# Altium PCB Main_V1.PcbDoc (part 2 of 2)
Units mil, origin at the board's own origin, x right, y up, seen from the top; angles counter-clockwise.
Board outline 5895 x 2900 mil, 4 copper layers (Top Copper, GND, PWR, Bottom Copper), stack 61.811 mil thick; 126 components, 83 nets, 421 pads, 572 vias.
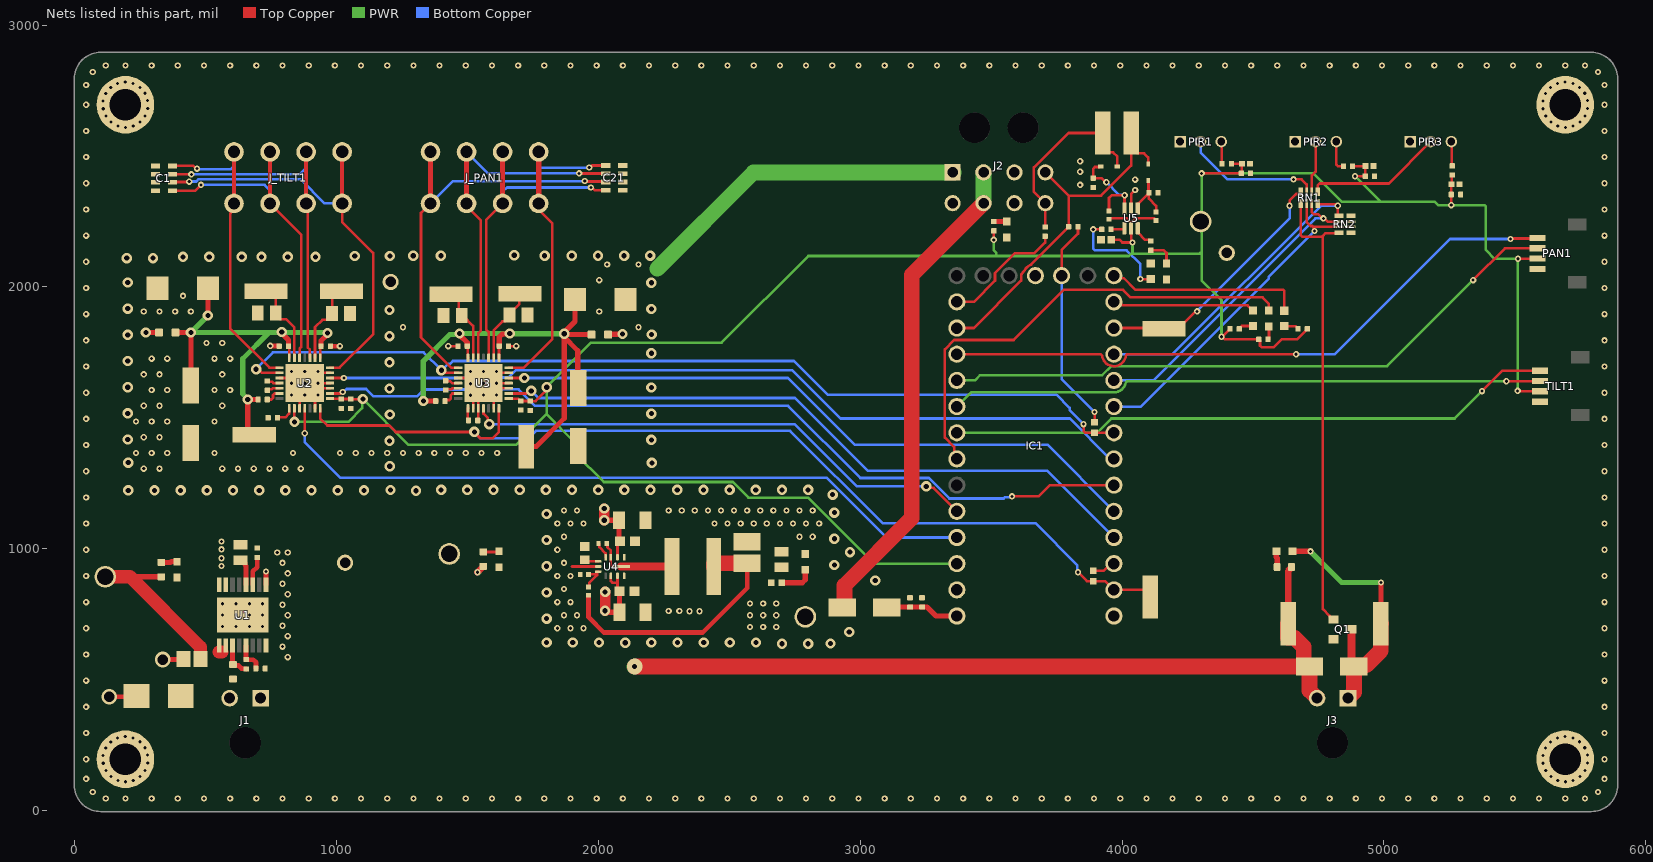
[diagram p4: the nets of this part, all layers, seen from the top]

## Via types
v1: diameter 24, hole 12, Top Copper to Bottom Copper, tented both sides, 452 vias
v2: diameter 39.37, hole 19.68, Top Copper to Bottom Copper, tented both sides, 106 vias
v3: diameter 40, hole 20, Top Copper to Bottom Copper, tented both sides, 11 vias
v4: diameter 60, hole 40, Top Copper to Bottom Copper, tented both sides, 2 vias
v5: diameter 60, hole 20, Top Copper to Bottom Copper, tented both sides, 1 vias

## Nets (pads, with @x,y where several pads share a name; then routed paths per layer and width w, separated by ;. In a path a pad name is that pad's centre, name@x,y a point inside that pad or via, vN(x,y) a via of type N, cw(c..) or ccw(c..) an arc to the next point about the centre after c; other vN are vias at no path point)
+3V3: 3V3.1 C10.2 C11.2 C17.2 C18.2 C31.1 C32.1 C33.1 C34.1 C35.1 C36.1 C37.1 IC1.31 PAN1.2 R15.2 R16.2 R17.2 R18.2 R20.2 R23.1 R25.1 R26.1 R28.1 TILT1.2 U2.9 U2.15 U3.15 U5.5 | length 10468.6
  Top Copper w10: v2(838.57,1484.57) U2.9@838.57,1536.09 ; U2.15@974.4,1573.49 974.72,1573.17 1016.54,1573.17 C10.2@1018,1571.72 1018.36,1572.07 C11.2@1053.64,1572.07 ; C11.2@1054,1571.43 1054.28,1571.72 1099.72,1571.72 v3(1100,1572) ; U3.15@1657.14,1573.49 1693.24,1573.49 1702.02,1564.72 C17.2@1703,1564.72 1703.36,1564.36 1738.64,1564.36 C18.2@1739,1564 1760,1564 1796.26,1600.26 1796.26,1611.26 v3(1802,1617) ; v1(3510,2180) R28.1@3510,2214.57 ; R20.2@3950,2258.33 3953.67,2262 4018,2262 4031.54,2248.46 4031.54,2242.83 4034.41,2242.83 4037.17,2242.83 U5.5@4037.22,2242.78 ; C37.1@3958.58,2180 3991.45,2180 4001.45,2170 v1(4040,2170) 4040,2173.79 4034.41,2179.38 U5.5@4034.41,2224.41 4034.41,2243.41 4054,2263 4121.08,2263 4129.92,2254.17 R18.2@4130,2254.17 ; v1(4304,2434) C31.1@4455.57,2434 4456.93,2435.36 4456.93,2469.64 C32.1@4457.79,2470.5 ; R23.1@4412.28,1840 4412.28,1839.02 4383.27,1810 v1(4380,1810) 4382.86,1810 4392.86,1800 R25.1@4522.28,1800 4527.13,1795.16 4527.13,1775.86 4532.98,1770 4580,1770 4610,1800 4668.7,1800 4707.72,1839.02 R26.1@4707.72,1840 ; R15.2@4417.72,2470 4418.22,2470.5 C32.1@4457.79,2470.5 ; C32.1@4458.29,2471 C32.1@4457.79,2470.5 ; R16.2@4880.72,2461 4881.22,2461.5 4929.15,2461.5 C34.1@4929.32,2461.68 ; v1(4890,2423) C33.1@4929,2423 4929.32,2423.32 C34.1@4929.32,2461.68 ; C34.1@4929.65,2462 C34.1@4929.32,2461.68 ; C35.1@5257,2349 5257,2392 C36.1@5257,2395 ; v1(5257.57,2312.57) C35.1@5257.57,2353 ; C36.1@5258.29,2392 5259.15,2392.85 5259.15,2428.43 R17.2@5260,2429.28 ; v1(5511,1603) 5512.69,1601.32 TILT1.2@5597.26,1601.32 ; v1(5512.5,2107.5) 5512.91,2107.91 5585.86,2107.91 PAN1.2@5586.26,2108.31
  PWR w10: v2(838.57,1484.57) 1044.57,1484.57 1097,1537 1097,1569 v3(1100,1572) 1275,1397 1685,1397 1802,1514 ; IC1.31@3369,943 3052.11,943 2799.8,1195.31 2572.67,1195.31 2513.3,1254.69 2020.31,1254.69 1911.16,1363.84 1911.16,1404.84 1802,1514 ; v1(3510,2180) 3510,2140 3520,2130 3520,2118 ; v1(4040,2170) 4040,2132.77 4033.72,2126.49 ; 4299.63,2130 4304,2134.37 ; 4299.82,2129.82 4296.49,2126.49 4033.72,2126.49 ; v1(4380,1810) 4380,1949.18 4304,2025.18 4304,2134.37 ; v1(4890,2423) 4987,2326 ; v1@5257.57,2311.57 5208.43,2311.57 5194,2326 4987,2326 ; v1(5257.57,2312.57) 5383.71,2312.57 5389.57,2306.71 5389.57,2141.43 5423.5,2107.5 v1(5512.5,2107.5) 5511.75,2106.75 5511.75,1603.75 v1(5511,1603) ; 1802,1514 v3(1802,1617) 1972.31,1787.31 2470.82,1787.31 2801.5,2118 3520,2118 ; 3520,2118 4025.23,2118 4033.72,2126.49 ; 4304,2134.37 v1(4304,2434) 4731.11,2434 4839.11,2326 4987,2326
+3V3_R: IC1.16 R12.2 R14.2 | length 825.5
  Top Copper w10: IC1.16@3769,2043 3769,2141 3831.72,2203.72 R12.2@3831.72,2230 ; R14.2@3895,1482.69 v1(3895,1522)
  Bottom Copper w10: IC1.16@3769,2043 3769,1648 v1(3895,1522)
+5: +5.1 C27.1 C28.1 D4.1 J2.2 J2.6 L1.2 R10.2 R27.1 | length 2908.5
  Top Copper w18: R10.2@1962,822.33 1962,738 2020,680 2398,680 2568,850 C27.1@2568,944.64
  Top Copper w60: L1.2@2440.06,932 2440.06,942.79 2441.91,944.64 C27.1@2568,944.64 ; D4.1@2928.35,777 2935.18,777 2939.62,781.45 2939.62,859.62 3197,1117 3197,2045.99 J2.6@3470.82,2319.81
  PWR w60: J2.6@3470.82,2319.81 J2.2@3470.82,2437.92
  other v1: 2579,701 2629,701 2679,701 2579,746 2629,746 2679,746 2579,791 2629,791 2679,791
+5OUT_Pan: C15.2 U3.8 | length 47.3
  Top Copper w10: C15.2@1498.72,1486 C15.2@1499.03,1486.31 ; C15.2@1501.31,1489.31 1501.31,1535.77 U3.8@1501.63,1536.09
+5OUT_Tilt: C7.2 U2.8 | length 74.5
  Top Copper w10: C7.2@769.72,1502 804,1502 818.57,1516.57 818.57,1535.77 U2.8@818.89,1536.09
+24: +24.1 C3.2 D1.1 J1.2 R1.2 R22.1 U1.1 U1.2 | length 649.8
  Top Copper w20: 211,893 329.44,893 R22.1@330,892.44
  Top Copper w50: +24.1@116,893 211,893 479.52,624.48 C3.2@479.52,578.69 ; U1.1@551,605.41 561,605.41
DIAG_Pan: IC1.29 U3.11 | length 1993.3
  Top Copper w10: U3.11@1560.68,1536.09 1561,1535.77 1561,1515.97 1577.26,1499.71 1577.26,1481.74 v3(1583,1476) ; v3(3252,1238) 3257.74,1232.26 3279.74,1232.26 IC1.29@3369,1143
  Bottom Copper w10: v3(1583,1476) 2749,1476 2987,1238 v3(3252,1238)
DIAG_Tilt: IC1.30 U2.11 | length 2770.9
  Top Copper w10: v1(877.94,1440.94) U2.11@877.94,1536.09
  Bottom Copper w10: v1(877.94,1440.94) 877.94,1407.07 1014.02,1271 2872,1271 3100,1043 IC1.30@3369,1043
DIR_Pan: IC1.5 U3.19 | length 2522.8
  Top Copper w10: U3.19@1657.14,1652.23 v3(1717.23,1652.23)
  Bottom Copper w10: v3(1717.23,1652.23) 2723.77,1652.23 2978.65,1397.35 3714.65,1397.35 IC1.5@3969,1143
DIR_Tilt: IC1.7 U2.19 | length 3147.5
  Top Copper w10: U2.19@974.4,1652.23 v1(1027.23,1652.23)
  Bottom Copper w10: v1(1027.23,1652.23) 1538.23,1652.23 1540,1654 1656,1654 1684.23,1682.23 2739.77,1682.23 2924.65,1497.35 3800.54,1497.35 3954.89,1343 IC1.7@3969,1343
EN: IC1.8 R14.1 U2.2 U3.2 | length 3644.9
  Top Copper w10: v3(692,1686) 700.12,1686 714.2,1671.91 U2.2@781.49,1671.91 ; v3(1400,1682.23) 1408.12,1682.23 1418.43,1671.91 U3.2@1464.23,1671.91 ; v1(3853,1476) 3853,1449.02 3858.86,1443.16 3968.84,1443.16 IC1.8@3969,1443
  Bottom Copper w10: v3(692,1686) 756,1750 1332.23,1750 v3(1400,1682.23) ; v3@1400.54,1680.61 1425.83,1705.9 1432.9,1705.9 1444,1717 2747,1717 2875.35,1588.65 3749.67,1588.65 3799.99,1538.32 3799.99,1529.01 v1(3853,1476) ; IC1.8@3968.84,1443.16 IC1.8@3969,1443
Fault: Fault.1 IC1.27 | length 1816
  Top Copper w10: IC1.27@3369,1343 3358.37,1353.63 3358.37,1389.07 3323.35,1424.09 3323.35,1761.91 3358.79,1797.35 3585.88,1797.35 3777.18,1988.65 4004.26,1988.65 4032.91,1960 4536.5,1960 4560,1936.5 Fault.1@4560,1910.5
GND: +3V3.1 C1.5 C1.6 C1.7 C1.8 C2.2 C3.1 C7.1 C8.2 C9.2 C10.1 C11.1 C14.2 C15.1 C16.2 C17.1 C18.1 C19.2 C20.2 C21.5 C21.6 C21.7 C21.8 C23.2 C24.2 C25.2 C26.2 C27.2 C28.2 C29.2 C30.2 C31.2 C32.2 C33.2 C34.2 C35.2 C36.2 C37.2 C38.1 C39.1 D1.2 D2.2 D3.2 GND1.1 GND3.1 GND.1 IC1.1 IC1.17 IC1.32 J1.1 J2.3 J2.5 J2.7 LED2.1 LED3.1 LED5.1 pad.20 PAN1.1 PIR1.1 PIR2.1 PIR3.1 Q1.2 R3.2 R6.2 R7.1 R8.2 R9.1 RN2.5 RN2.6 RN2.7 RN2.8 RX.1 TILT1.1 TX.C U1.9 U2.3 U2.10 U2.13 U2.17 U2.18 U2.20 U2.29 U3.3 U3.9 U3.10 U3.13 U3.17 U3.18 U3.20 U3.29 U4.1 U4.6 U4.11 U5.2 | length 1722.6
  Top Copper w10: U2.3@781.49,1652.23 858.26,1652.23 U2.29@877.94,1632.54 ; U2.10@858.26,1536.09 858.26,1612.86 U2.29@877.94,1632.54 ; U2.13@917.32,1536.09 917.32,1593.17 897.63,1612.86 U2.17@974.4,1612.86 ; U2.29@928,1632.54 U2.18@974.4,1632.54 ; U2.20@974.4,1671.91 917.32,1671.91 U2.29@877.94,1632.54 ; v1(1426,1774) C14.2@1463.28,1774 ; U3.3@1464.23,1652.23 1541,1652.23 U3.29@1560.68,1632.54 U3.29@1580.37,1612.86 ; U3.9@1521.31,1536.09 1521.31,1593.17 1541,1612.86 U3.10@1541,1536.09 1541,1489.28 C15.1@1536.72,1485 ; U3.13@1600.06,1536.09 1600.06,1593.17 U3.29@1580.37,1612.86 ; U3.29@1610.74,1632.54 U3.18@1657.14,1632.54 ; U3.29@1610.74,1671.91 U3.20@1657.14,1671.91 ; C16.2@1656.43,1774 v1(1686,1774) ; U3.17@1657.14,1612.86 U3.29@1580.37,1612.86 ; 1899,932 U4.6@1998.88,932 ; U5.2@4034.41,2300 4034.41,2354.41 v1(4050,2370)
  Top Copper w15: v1(192.4,282.25) 218.99,282.25 pad.20@227.43,290.7
  Top Copper w18: v4(131,434.69) 232.35,434.69 D1.2@235.35,437.69 ; v4(336,576.69) 412.48,576.69 C3.1@414.48,578.69 ; R3.2@697.55,1899 R3.2@698.55,1900 ; v1@730,912.69 v1(730.08,912.61) 730.16,912.54 U1.9@730.16,862.14 ; v1(746,1775) 746.5,1774.5 779.78,1774.5 C8.2@780.28,1774 ; C9.2@975.72,1774 v1(1012,1774) ; R6.2@1051.45,1898 R6.2@1052.45,1899
  other v1: 118,46 193,46 293,46 393,46 493,46 593,46 693,46 793,46 893,46 993,46 1093,46 1193,46 1293,46 1393,46 1493,46 1593,46 1693,46 1793,46 1893,46 1993,46 2093,46 2193,46 2293,46 2393,46 2493,46 2593,46 2693,46 2793,46 2893,46 2993,46 3093,46 3193,46 3293,46 3393,46 3493,46 3593,46 3693,46 3793,46 3893,46 3993,46 4093,46 4193,46 4293,46 4393,46 4493,46 4593,46 4693,46 4793,46 4893,46 4993,46 5093,46 5193,46 5293,46 5393,46 5493,46 5593,46 5693,46 5768,46 68,71 5818,71 193.6,109.75 5693.6,109.75 164.06,114.74 223.06,115.15 5664.06,114.74 5723.06,115.15 43,121 5843,121 138.02,129.54 248.9,130.31 5638.02,129.54 5748.9,130.31 118.6,152.35 5618.6,152.35 268,153.39 5768,153.39 108.16,180.43 5608.16,180.43 278.05,181.61 5778.05,181.61 43,196 5843,196 107.95,210.39 5607.95,210.39 277.84,211.57 5777.84,211.57 118,238.61 5618,238.61 267.4,239.65 5767.4,239.65 137.1,261.69 247.98,262.46 5637.1,261.69 5747.98,262.46 162.93,276.85 162.93,276.85 221.94,277.26 5662.93,276.85 5662.93,276.85 5721.94,277.26 192.4,282.25 5692.4,282.25 5692.4,282.25 43,296 5843,296 43,396 5843,396 43,496 5843,496 43,596 5843,596 43,696 1843,696 1893,696 1943,696 5843,696 1868,746 1918,746 2348,761 2386,761 2268,762 2309,762 43,796 1843,796 1893,796 5843,796 1868,846 43,896 1843,896 1893,896 5843,896 1868,946 43,996 1843,996 5843,996 1868,1046 2768,1046 2818,1046 43,1096 1843,1096 1893,1096 1943,1096 2443,1096 2493,1096 2543,1096 2593,1096 2643,1096 2693,1096 2743,1096 2793,1096 2843,1096 5843,1096 1868,1146 1918,1146 2268,1146 2318,1146 2368,1146 2418,1146 2468,1146 2518,1146 2568,1146 2618,1146 2668,1146 2718,1146 2768,1146 2818,1146 43,1196 5843,1196 43,1296 5843,1296 263,1306 323,1306 563,1306 623,1306 683,1306 743,1306 803,1306 863,1306 233,1366 293,1366 353,1366 533,1366 833,1366 1013,1366 1073,1366 1133,1366 1193,1366 1253,1366 1313,1366 1373,1366 1433,1366 1493,1366 1553,1366 1613,1366 43,1396 5843,1396 263,1426 323,1426 233,1486 293,1486 353,1486 533,1486 43,1496 5843,1496 263,1546 323,1546 563,1546 1510.74,1586.23 828,1587 878,1587 928,1587 1560.74,1587 1610.74,1587 43,1596 5843,1596 293,1606 353,1606 533,1606 593,1606 1510.74,1630.23 828,1632 878,1632 928,1632 1560.74,1632 1610.74,1632 263,1666 323,1666 563,1666 828,1677 878,1677 928,1677 1510.74,1677 1560.74,1677 1610.74,1677 43,1696 5843,1696 293,1726 353,1726 533,1726 593,1726 503,1786 563,1786 43,1796 5843,1796 1253,1846 2153,1846 43,1896 5843,1896 263,1906 323,1906 383,1906 443,1906 2003,1906 413,1966 43,1996 5843,1996 2003,2026 2033,2086 2153,2086 43,2096 5843,2096 43,2196 5843,2196 43,2296 5843,2296 3840,2390 43,2396 5843,2396 4050,2410 3840,2440 3840,2480 43,2496 5843,2496 43,2596 5843,2596 193.6,2609.75 5693.6,2609.75 164.06,2614.74 223.06,2615.15 5664.06,2614.74 5723.06,2615.15 138.02,2629.54 248.9,2630.31 5638.02,2629.54 5748.9,2630.31 118.6,2652.35 5618.6,2652.35 268,2653.39 5768,2653.39 108.16,2680.43 5608.16,2680.43 278.05,2681.61 5778.05,2681.61 43,2696 5843,2696 107.95,2710.39 5607.95,2710.39 277.84,2711.57 5777.84,2711.57 118,2738.61 5618,2738.61 267.4,2739.65 5767.4,2739.65 137.1,2761.69 247.98,2762.46 5637.1,2761.69 5747.98,2762.46 43,2771 5843,2771 162.93,2776.85 162.93,2776.85 221.94,2777.26 5662.93,2776.85 5662.93,2776.85 5721.94,2777.26 192.4,2782.25 192.4,2782.25 5692.4,2782.25 5692.4,2782.25 68,2821 5818,2821 118,2846 193,2846 293,2846 393,2846 493,2846 593,2846 693,2846 793,2846 893,2846 993,2846 1093,2846 1193,2846 1293,2846 1393,2846 1493,2846 1593,2846 1693,2846 1793,2846 1893,2846 1993,2846 2093,2846 2193,2846 2293,2846 2393,2846 2493,2846 2593,2846 2693,2846 2793,2846 2893,2846 2993,2846 3093,2846 3193,2846 3293,2846 3393,2846 3493,2846 3593,2846 3693,2846 3793,2846 3893,2846 3993,2846 4093,2846 4193,2846 4293,2846 4393,2846 4493,2846 4593,2846 4693,2846 4793,2846 4893,2846 4993,2846 5093,2846 5193,2846 5293,2846 5393,2846 5493,2846 5593,2846 5693,2846 5768,2846
  other v2: 2701,637 2801,637 2886,638 2102,641.13 1802,642 1902,642 2002,642 2202,642 2302,642 2402,642 2502,642 2602,642 2958,682 1802,733 1802,833 3057,879 1802,933 2901,938 2961,987 1802,1033 2901,1038 1802,1133 2901,1138 2894.35,1206.67 1302.69,1221.7 204,1223 304,1223 404,1223 504,1223 604,1223 704,1223 804,1223 904,1223 1004,1223 1104,1223 1205.69,1224 1399,1225 1499,1225 1599,1225 1699,1225 1799,1225 1899,1225 1999,1225 2099,1225 2199,1225 2301,1225 2401,1225 2501,1225 2601,1225 2701,1225 2801,1225 1202.53,1315.2 2204,1328 204,1329 1202,1412 2202,1416 202,1417 1202.99,1512.99 2202,1516 202,1517 1202,1612 2202,1616 202,1617 1202,1712 202,1717 2202,1746.69 1202,1812 202,1817 2203,1818 1202,1912 2202,1916 202,1917 2202,2016 202,2017 198,2110 298,2110 413,2115 513,2115 637.3,2115 713,2115 813,2115 918.69,2115 1069,2118 1203,2118 1292.31,2119 1398,2119 1794.31,2119 1898,2119 1998,2119 2098,2119 2197.33,2119.67 1678,2121
MotorReady: IC1.14 MotorReady.C | length 750
  Top Copper w10: IC1.14@3969,2043 3978.78,2033.22 4006.78,2033.22 4050,1990 4614.14,1990 4620,1984.14 MotorReady.C@4620,1909.53
NetC2_1: C2.1 C5.1 C8.1 C9.1 D2.1 F1.1 U2.22 U2.28 VM_M1.1 | length 1693.1
  Top Copper w10: C8.1@813.06,1774 818.89,1768.17 U2.28@818.89,1729 ; U2.22@937,1729 937,1770.72 C9.1@940.28,1774
  Top Copper w20: F1.1@383.99,1826 v2(443,1826) C2.1@443,1624.24 ; v2(508,1891) D2.1@508,1995 ; VM_M1.1@685,1435 679.53,1435 660,1454.53 v2(660,1570) C5.1@699.57,1570 ; v2(790,1828) 790,1822.76 816,1796.76 C8.1@816,1774.28 ; C9.1@940.28,1774 940.44,1774.16 940.44,1794.2 965,1818.76 v2(965,1824)
  PWR w20: v2(508,1891) v2(443,1826) 741,1826 ; v2(660,1570) 660,1572.4 641,1591.4 641,1726 741,1826 ; v2(965,1824) 963,1826 792,1826 v2(790,1828) 788,1826 741,1826
NetC4_1: C4.1 U1.12 | length 107.5
  Top Copper w18: C4.1@632,956.17 639.87,956.17 649.57,946.46 649.57,938.59 653.39,934.78 U1.12@653.39,862.14
NetC5_2: C5.2 U2.6 | length 62.8
  Top Copper w10: C5.2@735,1570 751,1570 756.86,1575.86 756.86,1587.32 762.4,1592.86 781.17,1592.86 U2.6@781.49,1593.17
NetC6_1: C6.1 U2.4 | length 48.9
  Top Copper w10: C6.1@735.98,1640.72 738.56,1638.14 752.86,1638.14 758.46,1632.54 U2.4@781.49,1632.54
NetC6_2: C6.2 U2.5 | length 48.6
  Top Copper w10: C6.2@735.98,1605.28 739.68,1608.98 751.75,1608.98 755.63,1612.86 U2.5@781.49,1612.86
NetC12_1: C12.1 C14.1 C16.1 C19.1 D3.1 F2.1 U3.22 U3.28 VM_M2.1 | length 2036
  Top Copper w10: C14.1@1498.72,1774 1501.31,1771.4 1501.31,1729.32 U3.28@1501.63,1729 ; U3.22@1619.74,1729 1620.06,1729.32 C16.1@1620.06,1773.06
  Top Copper w20: v2(1331,1564) C12.1@1378.28,1564 ; v2(1469,1822) 1469,1816.76 1498.56,1787.2 1498.56,1774.16 C14.1@1498.72,1774 ; C16.1@1621,1774 1621,1808.76 1632.72,1820.47 1659.47,1820.47 v2(1661,1822) ; VM_M2.1@1729.9,1387.1 1733.8,1391 1762,1391 1869.23,1498.23 v2@1869.23,1808.19 ; v2@1866,1824 1910.54,1868.54 D3.1@1910.54,1952 ; v2(1869,1821) 1869.23,1820.77 v2@1869.23,1808.19 ; v2@1872,1818 F2.1@1973.5,1818 ; C19.1@1921,1556.74 1921,1756.41 v2@1869.23,1808.19
  PWR w20: v2(1331,1564) 1331,1717.18 1432.11,1818.29 1465.29,1818.29 v2(1469,1822) v2(1661,1822) 1661.5,1821.5 1860.05,1821.5 1861,1820.55 v2@1861,1819
NetC12_2: C12.2 U3.6 | length 69.8
  Top Copper w10: C12.2@1413.72,1564 1417.73,1568.02 1430.14,1568.02 1436,1573.87 1436,1587 1441.86,1592.86 U3.6@1463.91,1592.86
NetC13_1: C13.1 U3.4 | length 52
  Top Copper w10: C13.1@1416,1641.72 1418.19,1639.52 1434.25,1639.52 1441.23,1632.54 U3.4@1464.23,1632.54
NetC13_2: C13.2 U3.5 | length 51
  Top Copper w10: C13.2@1416,1606.28 1419.08,1609.36 1438.64,1609.36 1442.14,1612.86 U3.5@1464.23,1612.86
NetC20_1: C20.1 U4.5 | length 53.4
  Top Copper w10: C20.1@1948,957.82 1954.13,951.68 U4.5@1998.88,951.68
NetC22_1: C22.1 U4.4 | length 63.8
  Top Copper w10: C22.1@2000.25,1020 2003.13,1017.13 2003.13,1005.87 2027.43,981.57 U4.4@2027.43,967.43
NetC29_1: C29.1 C30.1 D4.2 IC1.33 | length 285.9
  Top Copper w20: D4.2@3097.65,777 3097.93,777.28 C29.1@3190,777.28 3190.14,777.43 3235.86,777.43 C30.1@3236,777.57 3254.43,777.57 3289,743 IC1.33@3369,743
NetC38_2: C38.2 R18.1 U5.1 U6.2 | length 211.1
  Top Copper w10: U5.1@4060,2300 4062.87,2302.87 4062.87,2319.61 4102.28,2359.02 C38.2@4102.28,2360 ; U6.2@4100,2407 4101.14,2405.86 4101.14,2361.14 C38.2@4102.28,2360 ; R18.1@4130,2285.83 4130,2310 4102.28,2337.72 C38.2@4102.28,2360
NetC39_2: C39.2 R20.1 U5.3 U7.2 | length 386.8
  Top Copper w10: C39.2@3890,2415.43 3920.78,2415.43 3936.21,2400 v1(3940,2400) ; C39.2@3890,2416.69 3890,2452.14 3895.86,2458 3913.5,2458 3915.5,2460 U7.2@3918.5,2460 ; R20.1@3950,2292.18 3950,2340 3960,2350 v1(4010,2350) 4009.41,2349.41 4009.41,2290.59 U5.3@4010,2290
  Bottom Copper w10: v1(3940,2400) 3987.32,2352.68 4007.32,2352.68 v1(4010,2350)
NetD6_A: R21.2 TX.A | length 408.1
  Top Copper w10: v1(3890,2220) R21.2@3922.28,2220 ; v1(4070,2030) 4109.53,2030 TX.A@4110,2030.47
  Bottom Copper w10: v1(3890,2220) 3890,2145.86 3895.86,2140 4017.14,2140 4070,2087.14 v1(4070,2030)
NetD7_A: R23.2 Status.A | length 57.4
  Top Copper w10: R23.2@4447.72,1840 4447.72,1840.98 4457.68,1850.94 Status.A@4500,1850.94
NetD8_A: MotorReady.A R26.2 | length 57.2
  Top Copper w10: MotorReady.A@4620,1850.47 4662.8,1850.47 4672.28,1840.98 R26.2@4672.28,1840
NetIC1_3: IC1.3 R13.2 | length 90.3
  Top Copper w10: R13.2@3890,915.69 3928.75,915.69 3956.07,943 IC1.3@3969,943
NetIC1_21: IC1.21 R11.1 | length 471.6
  Top Copper w10: IC1.21@3369,1943 3433.56,1943 3514.65,2024.09 3514.65,2053.21 3589.44,2128 3664,2128 3706,2170 R11.1@3706,2193.57
NetLED1_2: R19.2 RX.2 | length 104.1
  Top Copper w10: R19.2@4110,2140 4160,2140 4170,2130 RX.2@4170,2090
NetLED2_2: LED2.2 R22.2 | length 61.6
  Top Copper w20: R22.2@330,947.56 364.78,947.56 368.6,951.37 LED2.2@390,951.37
NetLED3_2: LED3.2 R24.2 | length 61.2
  Top Copper w10: R24.2@1560,987.56 1617.06,987.56 LED3.2@1620,990.5
NetLED4_2: Fault.2 R25.2 | length 50.4
  Top Copper w10: Fault.2@4560,1849.5 4561.14,1848.36 4561.14,1801.14 R25.2@4562.28,1800
NetLED5_2: LED5.2 R27.2 | length 132
  Top Copper w20: R27.2@2699.69,870 2778.28,870 2790,881.72 LED5.2@2790,918.5
NetLED6_2: +3V3.2 R28.2 | length 50.1
  Top Copper w20: R28.2@3510,2250 3510.16,2250.16 +3V3.2@3560,2250.16
NetLED7_2: LED7.2 R29.2 | length 49.1
  Top Copper w20: LED7.2@4588.63,977.56 4588.63,968.6 4592.44,964.78 R29.2@4592.44,930
NetPIR1_3: PIR1.3 R15.1 | length 86.4
  Top Copper w10: PIR1.3@4379,2555 4380.64,2553.36 4380.64,2471.64 R15.1@4382.28,2470
NetPIR2_3: PIR2.3 R16.1 | length 117.5
  Top Copper w10: PIR2.3@4818.37,2555 4818.37,2466.86 4824.23,2461 R16.1@4845.28,2461
NetPIR3_3: PIR3.3 R17.1 | length 93.6
  Top Copper w10: PIR3.3@5257.74,2555 5259.37,2553.37 5259.37,2464.35 R17.1@5261,2462.72
NetR1_1: R1.1 R2.1 U1.3 | length 129.8
  Top Copper w18: U1.3@602.2,629.86 602.2,559.49 608,553.69 625,553.69 636,542.69 639,542.69 639.87,541.82 653.16,541.82 R2.1@654,540.98
NetR2_2: R2.2 R4.2 U1.5 | length 117.5
  Top Copper w18: U1.5@653.39,629.86 653.53,629.72 653.53,576.88 R2.2@654,576.41 ; R2.2@654.98,576.41 681.25,576.41 691.8,565.87 R4.2@691.8,543.21
NetR5_2: R5.2 U1.11 | length 111.9
  Top Copper w18: U1.11@678.98,862.14 679.12,862.28 679.12,913.25 696,930.13 R5.2@696,966.98
NetR9_2: R9.2 R10.1 U4.7 | length 109.6
  Top Copper w10: R10.1@1962,854 1965.37,857.36 1965.37,870.36 1994.65,899.65 ; R9.2@1962,902 1992.29,902 1994.65,899.65 ; U4.7@1998.88,912.32 1994.73,912.32 1994.65,912.24 1994.65,899.65
NetR19_1: R19.1 U5.6 | length 80.4
  Top Copper w10: U5.6@4060,2224.41 4060,2208.86 4088.58,2180.28 4105.16,2180.28 R19.1@4110,2175.43 R19.1@4110.98,2175.43
NetR21_1: R21.1 U5.4 | length 53.8
  Top Copper w10: R21.1@3957.72,2220 4005.94,2220 4008.82,2222.87 U5.4@4008.82,2224.41
Pan_OA1: C21.4 J_PAN1.3 J_PAN1.4 U3.24 | length 1277.4
  Top Copper w10: U3.24@1580.37,1729 1580.37,1827.75 1571,1837.12 1571,2256.2 J_PAN1.3@1633.8,2319 ; v1(1971,2380) 1974.79,2380 1985.28,2369.5 C21.4@2028,2369.5
  Top Copper w20: J_PAN1.3@1633.8,2319 J_PAN1.4@1633.8,2515.85 J_PAN1.4@1641.57,2523.63
  Bottom Copper w10: J_PAN1.3@1633.8,2319 1636.18,2321.39 1636.18,2365.54 1650.64,2380 v1(1971,2380)
Pan_OA2: C21.1 J_PAN1.1 J_PAN1.2 U3.21 | length 1264.9
  Top Copper w10: U3.21@1657.14,1691.6 1714.6,1691.6 1824,1801 1824,2242.74 1783.99,2282.75 1783.99,2306.6 J_PAN1.1@1771.59,2319 ; v1(1965,2456) 1968.79,2456 1976.78,2463.99 C21.1@2028,2463.99
  Top Copper w20: J_PAN1.1@1771.59,2319 J_PAN1.2@1771.59,2515.85
  Bottom Copper w10: J_PAN1.2@1771.59,2515.85 1771.59,2461.86 1777.45,2456 v1(1965,2456)
Pan_OB1: C21.2 J_PAN1.5 J_PAN1.6 U3.26 | length 1405.4
  Top Copper w10: J_PAN1.5@1496,2329 1486,2319 J_PAN1.5@1496,2319 1496,2309 1551,2254 1551,1834 1541,1824 U3.26@1541,1729 ; v1(1926,2434) 1926.75,2433.25 2027.25,2433.25 C21.2@2028,2432.5
  Top Copper w20: J_PAN1.5@1496,2329 J_PAN1.6@1496,2515.85 J_PAN1.6@1503.78,2523.63
  Bottom Copper w10: J_PAN1.6@1496,2515.85 1577.85,2434 v1(1926,2434)
Pan_OB2: C21.3 J_PAN1.7 J_PAN1.8 U3.1 | length 1620.4
  Top Copper w10: J_PAN1.7@1358.2,2319 1322,2282.8 1322,1807 1437.4,1691.6 U3.1@1464.23,1691.6 ; v1(1947.42,2404.37) 1949.11,2402.69 2026.31,2402.69 C21.3@2028,2401
  Top Copper w20: J_PAN1.7@1358.2,2319 J_PAN1.8@1358.2,2515.85
  Bottom Copper w10: J_PAN1.7@1358.2,2319 1443.58,2404.37 v1(1947.42,2404.37)
Pan_SCL: IC1.23 PAN1.4 | length 2458.8
  Top Copper w10: IC1.23@3369,1743 3918.4,1743 3921.33,1740.07 3923.65,1737.74 ccw(c3969,1743) 4011.75,1726.99 4016.64,1740.04 ; v1(4665,1743) 4019.6,1743 4016.67,1740.07 ; v1(5484,2183) 5486.03,2185.03 5561.68,2185.03 5563.71,2183 5572.71,2192 PAN1.4@5594,2192 ; 4016.67,1740.07 ccw(c4023.74,1733) 4016.64,1740.04
  Bottom Copper w10: v1(4665,1743) 4813,1743 5253,2183 v1(5484,2183)
Pan_SDA: IC1.24 PAN1.3 | length 2426.3
  Top Copper w10: v1(5341,2026) 5462.69,2147.69 PAN1.3@5586.26,2147.69
  PWR w10: IC1.24@3369,1643 3437.89,1643 3457.57,1662.68 3924.13,1662.68 3958.79,1697.35 5012.35,1697.35 v1(5341,2026)
PBRA: PBRA1.1 R8.1 U3.23 | length 291.9
  Top Copper w10: U3.23@1600.06,1729 1600.06,1835.04 1633.48,1868.46 1642.91,1868.46 1660.55,1886.09 1660.55,1897.91 1697.98,1935.33 1697.98,1971.98 PBRA1.1@1700,1974
PBRB: PBRB1.1 R7.2 U3.27 | length 281
  Top Copper w10: PBRB1.1@1437,1972 1442.28,1972 1466.81,1947.47 1466.81,1911.64 1484.45,1894 1484.45,1888.09 1521.31,1851.23 U3.27@1521.31,1729
PIR1: PIR1.2 RN1.3 | length 524.9
  Top Copper w10: v1(4655,2411) 4686,2411 4705,2392 RN1.3@4705,2363.67
  Bottom Copper w10: PIR1.2@4300.26,2555 4300.26,2513.52 4402.78,2411 v1(4655,2411)
PIR1_F: IC1.9 RN1.6 RN2.3 | length 1267.4
  Top Copper w10: RN1.6@4705,2318 4705,2247.79 4720.06,2232.73 4726.88,2232.73 4730.06,2229.56 ; v1(4735.06,2213.94) 4732.38,2216.62 4732.38,2227.24 4730.06,2229.56 ; RN2.3@4828.33,2229.68 4828.21,2229.56 4730.06,2229.56
  Bottom Copper w10: IC1.9@3969,1543 4071.89,1543 4560.74,2031.86 4560.74,2039.63 v1(4735.06,2213.94)
PIR2: PIR2.2 RN1.2 | length 197.5
  Top Copper w10: RN1.2@4724.69,2363.67 4724.8,2363.79 4724.8,2425.8 4739.63,2440.63 PIR2.2@4739.63,2555
PIR2_F: IC1.10 RN1.7 RN2.2 | length 1207.7
  Top Copper w10: RN1.7@4724.69,2318 4724.8,2317.88 4724.8,2285.06 4731.87,2277.99 4749.22,2277.99 4765.21,2262 4772.79,2262 4785.43,2249.36 RN2.2@4828.33,2249.36
  Bottom Copper w10: IC1.10@3969,1643 4119.6,1643 4738.6,2262 v1(4769,2262)
PIR3: PIR3.2 RN1.1 | length 525.3
  Top Copper w10: RN1.1@4747.32,2363.67 4748.26,2364.61 4748.26,2389.14 4754.12,2395 5019,2395 PIR3.2@5179,2555
PIR3_F: IC1.11 RN1.8 RN2.1 | length 1210.4
  Top Copper w10: RN1.8@4747.32,2318 4748.85,2318 4750.39,2316.46 4813.76,2316.46 4820.21,2310 v1(4824,2310) 4824,2275.07 4827.07,2272 RN2.1@4828.33,2272
  Bottom Copper w10: IC1.11@3969,1743 4193,1743 4760,2310 v1(4824,2310)
RTN: C4.2 R4.1 R5.1 U1.8 U1.17 U1.V
  other v1: 813,586 793,626 813,666 793,706 813,746 793,786 813,826 793,866 813,906 793,946 773,986 813,986
SOL-: D5.1 J3.1 LED7.1 Q1.3 SOL-1.1 | length 1051.5
  Top Copper w20: LED7.1@4653,986 4657,990 v1(4720,990) ; SOL-1.1@4989,713 v1(4989,871)
  Top Copper w30: Q1.3@4877,692 4877,558.65 D5.1@4885.65,550
  Top Copper w60: J3.1@4863.06,428.99 4885.65,451.58 D5.1@4885.65,550 4890.09,554.45 4932.45,554.45 4988.53,610.53 4988.53,712.53 SOL-1.1@4989,713
  PWR w20: v1(4720,990) 4839,871 v1(4989,871)
SOL_CTRL: IC1.12 RN1.4 SOL_CTRL1.1 | length 909.5
  Top Copper w10: IC1.12@3969,1843 SOL_CTRL1.1@4095,1843 ; SOL_CTRL1.1@4160,1840 4213.15,1840 4280,1906.85 v1(4286.85,1906.85) ; v1(4640,2310) 4640,2330 4665.15,2355.15 4679.29,2355.15 4682.36,2358.22 RN1.4@4682.36,2363.67
  Bottom Copper w10: v1(4286.85,1906.85) 4286.85,1908.61 4640,2261.76 v1(4640,2310)
SOL_CTRL_F: Q1.1 RN1.5 RN2.4 | length 1754.8
  Top Copper w10: RN1.5@4682.36,2318 4682.36,2197.8 4688.22,2191.94 4763.53,2191.94 ; Q1.1@4807.31,729.4 4803.97,729.4 4793.18,740.19 4793.18,743.54 4766.72,770 4766.72,2195.13 4776.81,2205.23 4826.52,2205.23 RN2.4@4828.33,2207.04
Status: IC1.13 Status.C | length 544.7
  Top Copper w10: IC1.13@3969,1943 3979.63,1932.37 4000.26,1932.37 4002.63,1930 4480,1930 Status.C@4500,1910
STEP_Pan: IC1.4 U3.16 | length 2547.9
  Top Copper w10: U3.16@1657.14,1593.17 1725.06,1593.17 1734.88,1603 v3(1743,1603)
  Bottom Copper w10: v3(1743,1603) 1770,1576 2750,1576 3028.65,1297.35 3714.65,1297.35 IC1.4@3969,1043
STEP_Tilt: IC1.6 U2.16 | length 3217.9
  Top Copper w10: U2.16@974.4,1593.17 1014,1593.17 1019.38,1598.56 v1(1023.17,1598.56) ; v1(3580,1200) 3681.01,1200 3724.01,1243 IC1.6@3969,1243
  Bottom Copper w10: v1(1023.17,1598.56) 1026.96,1598.56 1038.4,1610 1112.51,1610 1140.19,1582.31 1307.33,1582.31 1333.25,1608.23 1519.85,1608.23 1520.62,1609 1694.57,1609 1757.89,1545.69 2724.31,1545.69 3000,1270 3262.43,1270 3340.38,1192.05 3548,1192.05 3553.27,1197.32 3577.32,1197.32 v1(3580,1200)
SW: C22.2 L1.1 U4.3 U4.12 | length 324.8
  Top Copper w10: C22.2@2031.75,1020 2034.62,1017.13 2034.62,1005.38 2047.11,992.89 U4.3@2047.11,967.43 2047.11,937.86 2052.97,932 U4.12@2085.02,932
  Top Copper w30: U4.12@2085.02,932 L1.1@2281,932
TBRA: R6.1 TBRA1.1 U2.23 | length 313.5
  Top Copper w10: U2.23@917.32,1729 917.32,1846.3 945.48,1874.46 964.91,1874.46 982.55,1892.09 982.55,1958.47 1007.08,1983 TBRA1.1@1018,1983
TBRB: R3.1 TBRB1.1 U2.27 | length 319.7
  Top Copper w10: TBRB1.1@730,1983 742.92,1983 767.45,1958.47 R3.1@767.45,1900 767.45,1894.09 785.09,1876.46 807.52,1876.46 838.57,1845.41 U2.27@838.57,1729
Teensy_RX: IC1.22 J2.4 R12.1 RX1.1 U6.1 | length 1363.7
  Top Copper w10: IC1.22@3369,1843 3433.56,1843 3614.65,2024.09 3614.65,2047.38 3632.91,2070.96 cw(c3669,2043) 3653.03,2085.77 3796.28,2229.02 3796.28,2348.68 ; J2.4@3707.04,2437.92 3796.28,2348.68 ; RX1.1@4035,2588 RX1.1@4035,2534.85 ; U6.1@4100,2470.87 4100,2495 4084.68,2510.32 4059.53,2510.32 RX1.1@4035,2534.85 ; 3796.28,2348.68 3919.79,2348.68 4035,2463.89 RX1.1@4035,2534.85
Teensy_TX: J2.8 R11.2 TX1.1 U7.1 | length 723.2
  Top Copper w10: R11.2@3706,2229 3706.52,2229.52 3706.52,2319.29 J2.8@3707.04,2319.81 3663.26,2363.59 3663.26,2456.06 3795.2,2588 TX1.1@3927,2588 3927,2538.86 3951.53,2514.33 3965.67,2514.33 3982.37,2497.63 U7.1@3982.37,2460
Tilt_OA1: C1.3 J_TILT1.3 J_TILT1.4 U2.24 | length 1391.1
  Top Copper w10: C1.3@372.48,2430.75 372.85,2430.37 444.51,2430.37 v1(444.89,2430) ; J_TILT1.3@883.2,2319 889,2313.2 889,1769 897.63,1760.37 U2.24@897.63,1729
  Top Copper w15: J_TILT1.4@867.04,2515.85 J_TILT1.4@883.2,2515.85 J_TILT1.3@883.2,2319
  Bottom Copper w10: v1(444.89,2430) 858,2430 883.2,2455.2 J_TILT1.4@883.2,2515.85
Tilt_OA2: C1.2 J_TILT1.1 J_TILT1.2 U2.21 | length 1655.4
  Top Copper w10: C1.2@372.48,2399.25 373.92,2400.69 435.45,2400.69 v1(436.89,2402.13) ; U2.21@974.4,1691.6 1011.6,1691.6 1139,1819 1139,2130 1021,2248 J_TILT1.1@1021,2319
  Top Copper w15: J_TILT1.1@1021,2319 J_TILT1.2@1021,2515.85
  Bottom Copper w10: v1(436.89,2402.13) 437.76,2403 463.89,2403 472.89,2412 861.3,2412 954.3,2319 J_TILT1.1@1021,2319
Tilt_OB1: C1.1 J_TILT1.5 J_TILT1.6 U2.26 | length 1279.4
  Top Copper w10: C1.1@372.48,2367.76 459.76,2367.76 v1(482,2390) ; J_TILT1.5@745.41,2319 864.59,2199.82 864.59,1770.54 858.26,1764.22 U2.26@858.26,1729
  Top Copper w15: J_TILT1.5@745.41,2319 J_TILT1.6@745.41,2515.85
  Bottom Copper w10: v1(482,2390) 724,2390 745.41,2368.59 J_TILT1.5@745.41,2319
Tilt_OB2: C1.4 J_TILT1.7 J_TILT1.8 U2.1 | length 1229.9
  Top Copper w10: C1.4@372.48,2462.24 452.08,2462.24 462.32,2452 v1(466.11,2452) ; J_TILT1.7@607.61,2319 595.21,2306.6 595.21,2281.95 594,2280.74 594,1840 742.4,1691.6 U2.1@781.49,1691.6
  Top Copper w15: J_TILT1.7@607.61,2319 J_TILT1.8@607.61,2515.85
  Bottom Copper w10: v1(466.11,2452) 468.35,2449.76 595.76,2449.76 607.61,2461.61 J_TILT1.8@607.61,2515.85
Tilt_SCL: IC1.26 TILT1.4 | length 2324.5
  Top Copper w10: v1(5375,1602) 5453.06,1680.06 TILT1.4@5595.26,1680.06
  PWR w10: IC1.26@3369,1443 3904.44,1443 3958.79,1497.35 5270.35,1497.35 v1(5375,1602)
Tilt_SDA: IC1.25 TILT1.3 | length 2269.7
  Top Copper w10: v1(5468,1640) 5468.34,1640.34 5594.92,1640.34 TILT1.3@5595.26,1640.68
  PWR w10: IC1.25@3369,1543 3423.65,1597.65 3963.23,1597.65 3963.78,1597.65 ccw(c3969,1643) 4011.09,1625.34 4016,1637.04 cw(c4023.11,1630) 4016.04,1637.07 4018.97,1640 v1(5468,1640)
TMC_UART: IC1.2 R13.1 U2.14 U3.14 UART1.1 | length 3733.9
  Top Copper w10: U2.14@937,1536.09 937,1498 964.33,1470.67 1201.35,1470.67 1226.02,1446 v3(1526,1446) 1550,1422 1595,1422 1619.43,1446.43 1619.43,1535.77 U3.14@1619.74,1536.09 ; v1(3832.13,910.36) 3866.17,876.32 3934.75,876.32 3968.07,843 IC1.2@3969,843 4083.47,843 4108,818.47 UART1.1@4108,816
  Bottom Copper w10: v3(1526,1446) 1550,1422 1733,1422 1761.5,1450.5 2732.5,1450.5 3085.65,1097.35 3668.96,1097.35 3829.45,936.87 3829.45,913.04 v1(3832.13,910.36)
VM: C23.1 C24.1 C25.1 C26.1 D5.2 F1.2 F2.2 J2.1 J3.2 R24.1 R29.1 SOL+1.1 U1.15 U1.16 U4.2 U4.9 U4.10 VM.1 | length 5138.7
  Top Copper w10: U4.9@2047.11,896.57 2047.11,876.89 2053.57,870.43 2072.7,870.43 ; C23.1@2072.7,844.3 2072.7,870.43 ; U4.10@2072.7,896.57 2072.7,870.43 ; U4.2@2072.7,967.43 C25.1@2072.7,1018.92
  Top Copper w20: v2(271,1826) F1.2@321,1826 ; v2(2022,1109) C24.1@2078.54,1109 2078.54,1031.23 C25.1@2081.78,1028 C25.1@2072.7,1018.92 ; v2(2025,763) 2030.24,763 2036.24,757 C26.1@2079.77,757 2080,757.23 C23.1@2080,837 ; F2.2@2036.99,1817.5 2038.49,1819 2091,1819 v2(2092,1820)
  Top Copper w25: v1(1537.56,910) R24.1@1560,932.44 ; SOL+1.1@4634,713 4634,914.48 4647.56,928.04 R29.1@4647.56,930
  Top Copper w40: v2(2022,1109) v3(2022,1153.63) ; v2(2025,763) v3(2025,835)
  Top Copper w60: v5(2138,550) D5.2@4716.35,550 ; SOL+1.1@4634,713 4634,660.8 4634.47,660.32 4658.57,660.32 4694.19,624.7 4694.19,554.45 4698.64,550 D5.2@4716.35,550 ; J3.2@4744.94,428.99 4744.94,429.86 4716.35,458.45 D5.2@4716.35,550
  PWR w25: v1(1537.56,910) v1@1540,910
  PWR w60: v5@2137,549 v5(2138,550) ; 2224.82,2069.82 2592,2437 J2.1@3357,2437
  other v1: 560,933.69 560,963.69 560,997.69 560,1027.69
pads on no net: IC1.15 IC1.18 IC1.19 IC1.20 IC1.28 J1. J2. J3. PAN1.5 PAN1.6 TILT1.5 TILT1.6 U1.4 U1.6 U1.7 U1.10 U1.13 U1.14 U2.7 U2.12 U2.25 U3.7 U3.12 U3.25 U4.8

## Polygon pours and split planes (outlines as drawn)
GND on Top Copper "GND_L01_P015" (solid, remove dead copper, pour order 15): 45.98,2892.98 -5,2842 0,0 31,0 5840.32,0 5883.41,47.7 5889,84 5889,2847 5839.98,2896.02
+24 on Top Copper "+24_L01_P013" (solid, pour order 13): 588,660 588,534 611,534 660,485 660,354 656,350 342,350 342,475 380,513 450,513 450,647 463,660 586,660
+5 on Top Copper "+5_L01_P014" (solid, pour order 14): 2406.61,978 2931,978 2931,673 2404.07,673
RTN on Top Copper "RTN_L01_P003" (solid, remove dead copper, pour order 3): 441,663 685,666.69 685,524.69 846,524.69 846,1037.69 603,1037.69 599,1033.69 599,934.69 662.5,934.69 665,932.19 663,930.19 663,830.69 536,830.69 439,830.69
VM on Top Copper "VM_L01_P012" (solid, pour order 12): 535,831.69 535.31,832 589,832 589,1043 532.97,1043
GND on Bottom Copper "GND_L04_P017" (solid, remove dead copper, pour order 17): -7,2917.49 -7,-12 -5,-10 5904,-10 5904,2896 5871.54,2928.46
RTN on Bottom Copper "RTN_L04_P016" (solid, remove dead copper, pour order 16): 591,1044 592,1043 857,1043 857,521 856,520 531,520 531,898 588.09,898
VM on PWR "VM_L03_P008" (solid, remove dead copper, pour order 8): 543.2,469 2234,469 2234,2154 2225,2145 163,2145 163,1188 531.02,1188
GND on GND (split plane): 5800.84,2875.61 5808.61,2874.46 5816.22,2872.55 5823.61,2869.91 5830.71,2866.55 5837.44,2862.51 5843.75,2857.84 5849.57,2852.57 5854.84,2846.75 5859.51,2840.44 5863.55,2833.71 5866.91,2826.61 5869.55,2819.22 5871.46,2811.61 5872.61,2803.84 5872.97,2796.63 5872.9,2796 5872.9,96 5872.97,95.37 5872.61,88.16 5871.46,80.39 5869.55,72.78 5866.91,65.39 5863.55,58.29 5859.51,51.56 5854.84,45.25 5849.57,39.43 5843.75,34.16 5837.44,29.49 5830.71,25.45 5823.61,22.09 5816.22,19.45 5808.61,17.54 5800.84,16.39 5793.63,16.03 5793,16.1 98,16.1 97.37,16.03 90.16,16.39 82.39,17.54 74.78,19.45 67.39,22.09 60.29,25.45 53.56,29.49 47.25,34.16 41.43,39.43 36.16,45.25 31.49,51.56 27.45,58.29 24.09,65.39 21.45,72.78 19.54,80.39 18.39,88.16 18.03,95.37 18.1,96 18.1,2796 18.03,2796.63 18.39,2803.84 19.54,2811.61 21.45,2819.22 24.09,2826.61 27.45,2833.71 31.49,2840.44 36.16,2846.75 41.43,2852.57 47.25,2857.84 53.56,2862.51 60.29,2866.55 67.39,2869.91 74.78,2872.55 82.39,2874.46 90.16,2875.61 97.37,2875.97 98,2875.9 5793,2875.9 5793.63,2875.97

## Other copper
Top Copper:
  pour cut-out: 2311.94,1067.5 2413,1067.5 2413,798.5 2317.97,798.5
  pour cut-out: 2495,904 2497,902 2587,902 2587,839 2554,806 2554,673 2408,673 2407,674 2407,902 2494.88,902
PWR:
  pour cut-out: 601,1026.5 601,853.5 593,845.5 544,845.5 544,474.7 551.2,467.5 552.2,468.5 853,468.5 853,1025.5 850,1028.5
Multi-Layer:
  pour cut-out: 588,983.69 676,983.69 677,982.69 665,970.69 665,893.69 588,893.69

## Silkscreen, mask and mechanical layers (free items; w line width, h text height)
Top Overlay:
  drawing of 69 lines, arcs and shapes, not listed
  text "Isolation / Zone" at 2104,2516 h35 r90
  text "PI" at 3192,2279 h60
  text "SOL" at 4530,1060 h60
  text "Garden / Sentry" at 4120,1054.14 h450
  text "+" at 530,480 h60
  text "-" at 738,476.01 h60
  text "+" at 4638,400 h60
  text "+" at 487,393 h60
  text "Sol" at 4450,320 h60
  text "VM" at 880,300 h60
  text "-" at 4537,251.01 h60
  text "+" at 4470,250 h60
  text "Turret_Driver V1.0 / Team EVO / Noah Marchman / Kennesaw State University" at 2721,55 h60
Mechanical 1:
  the board outline again, w10

## Dimensions
5793,2896 to 5793,-4 on Mechanical 1
-2,2796 to 5893,2796 on Mechanical 1

## Text inside footprints (layer, text, board x,y; h text height)
C2: Top Overlay "+" at 419,1710 h48 r90
C19: Top Overlay "+" at 1941.68,1693.94 h48 r90
U6: Top Overlay "*" at 4075,2507.5 h50 r270; Mechanical 13 "*" at 4075,2466.5 h50 r270
U7: Top Overlay "*" at 4019,2485 h50 r180; Mechanical 13 "*" at 3978,2485 h50 r180